# Altium PCB esp32p10displayPCB1.PcbDoc (part 1 of 3)
Units mil, origin at the board's own origin, x right, y up, seen from the top; angles counter-clockwise.
Board outline 3760 x 6044 mil, 2 copper layers (Top Layer, Bottom Layer); 134 components, 104 nets, 470 pads, 215 vias.
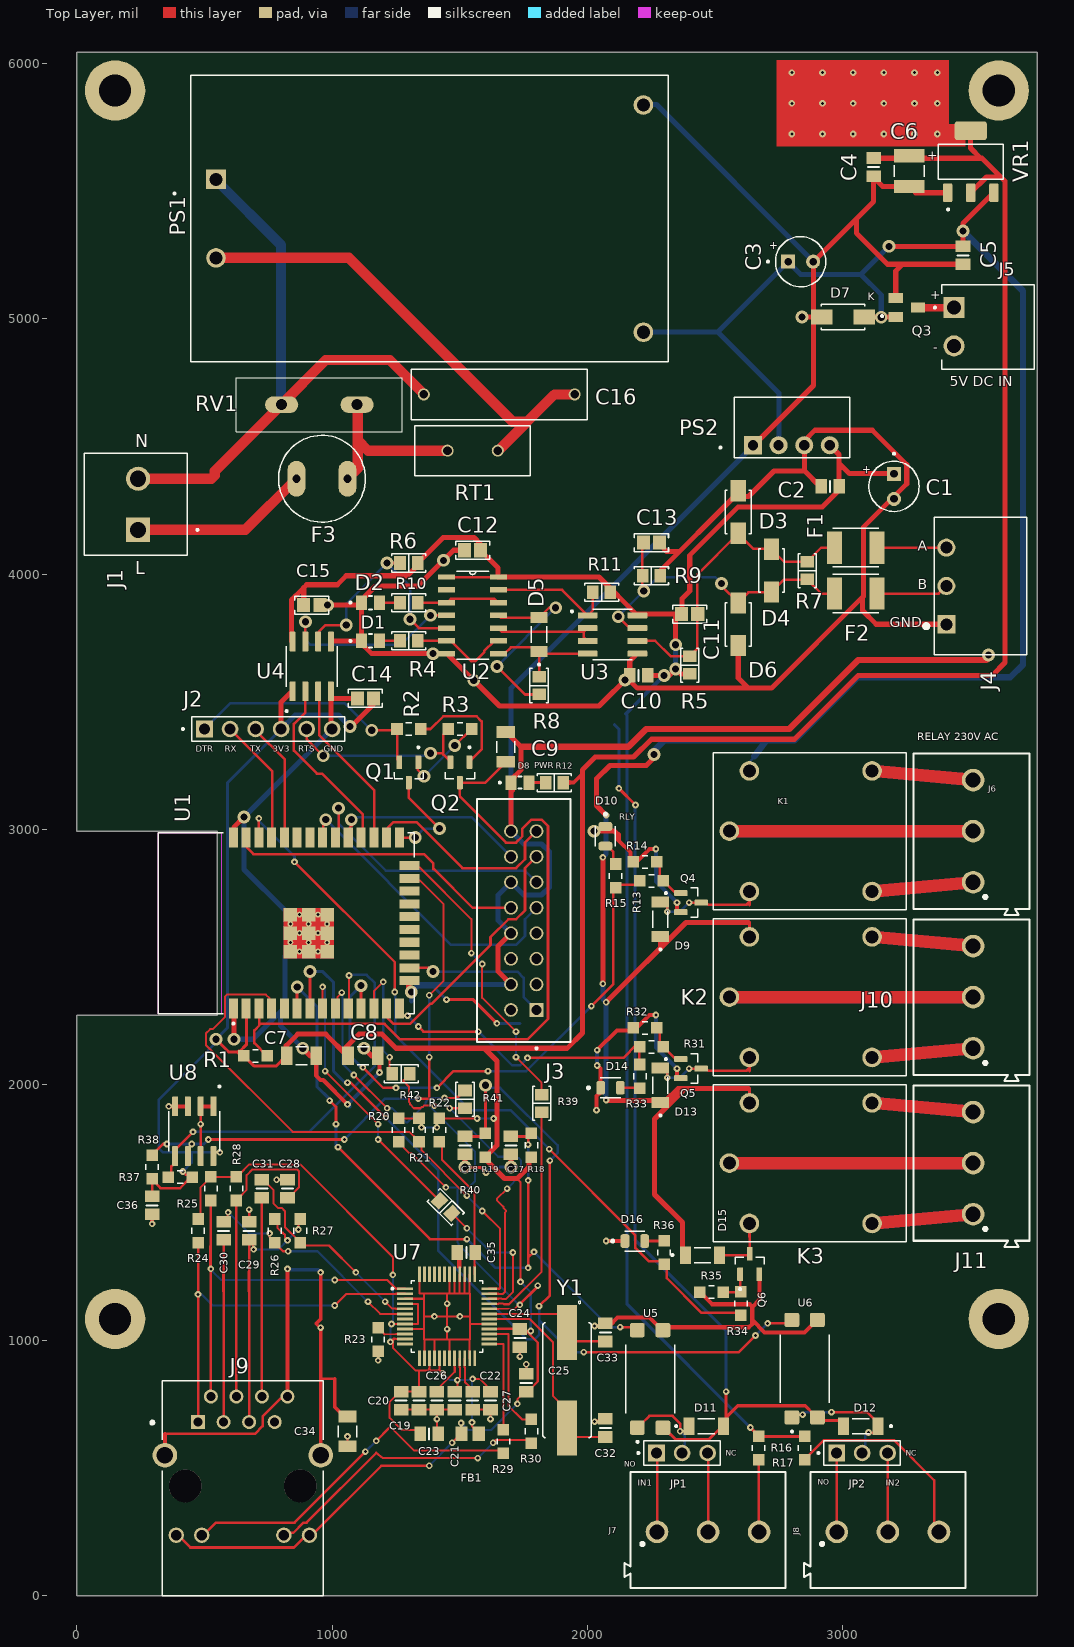
[diagram p0: Top Layer view]
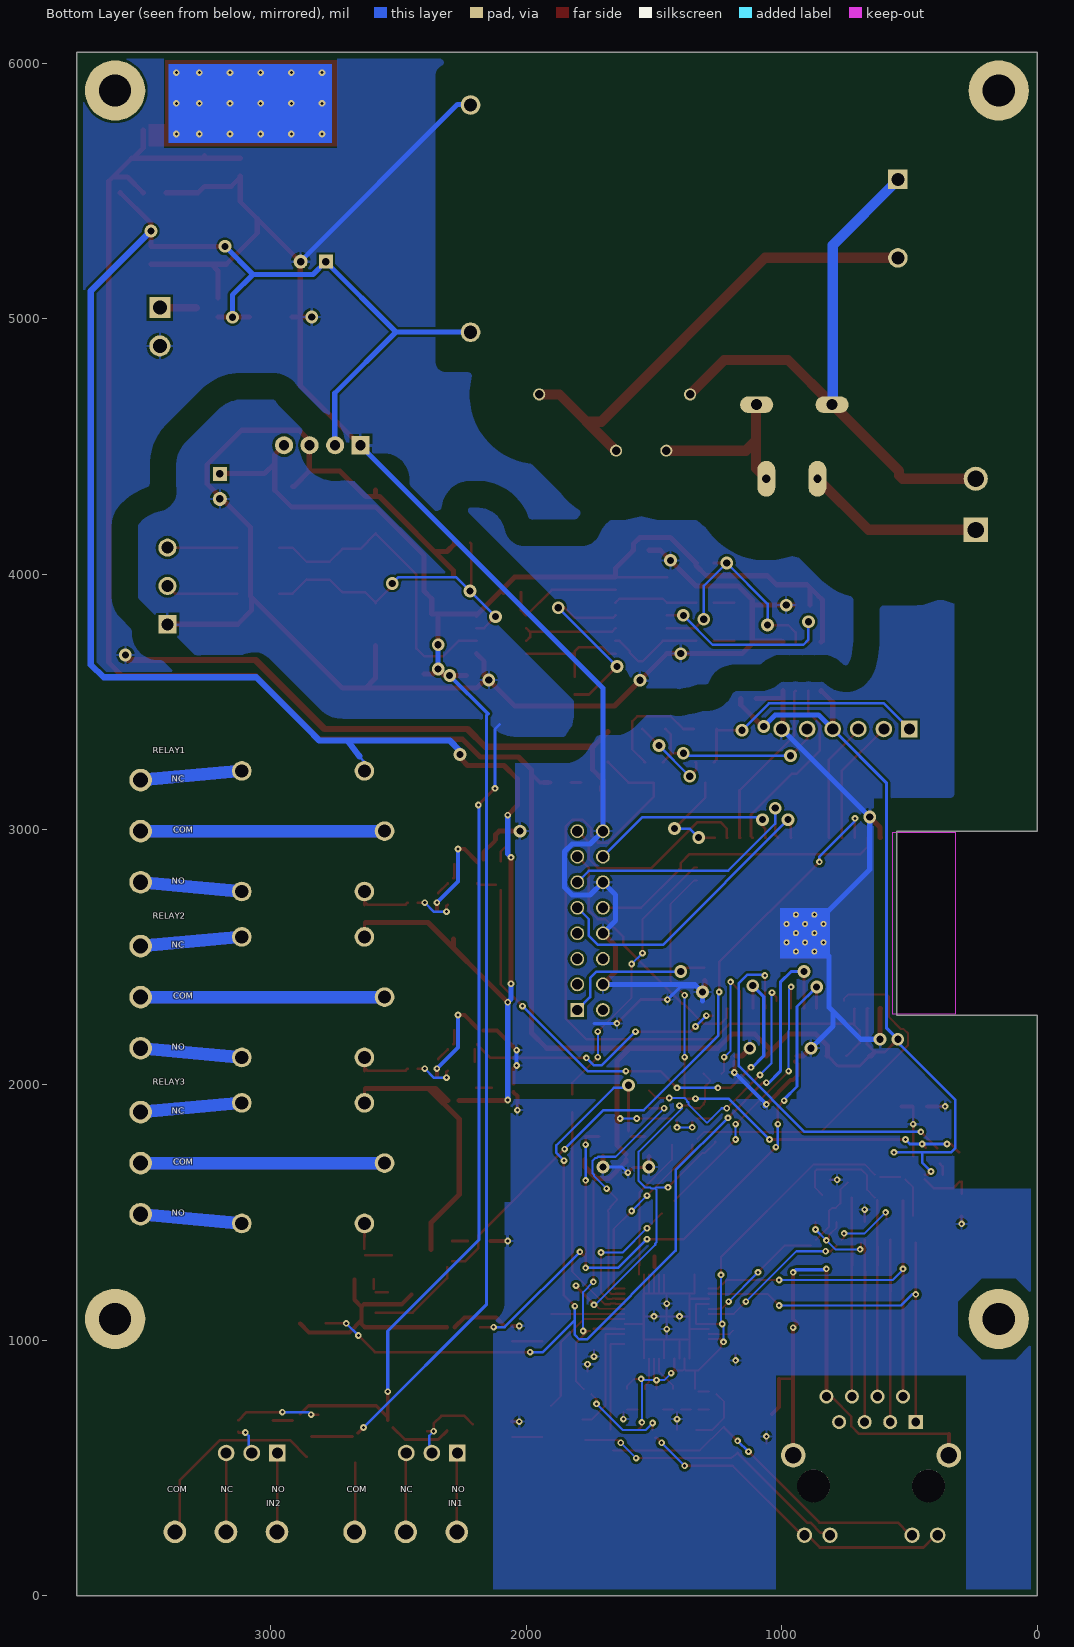
[diagram p1: Bottom Layer view, seen from below]
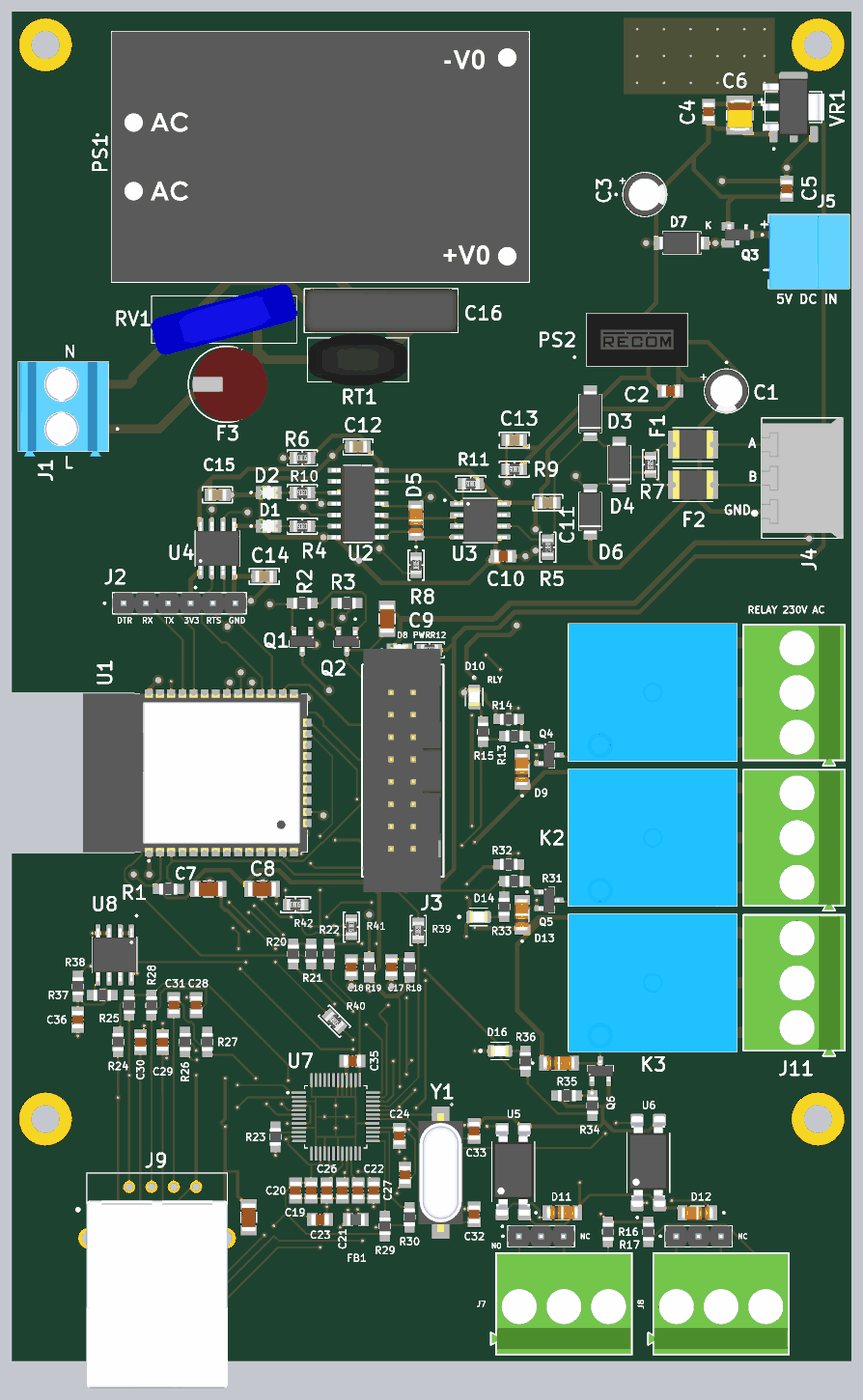
[diagram p3: 3D render of the assembled board from above, using the file's embedded part models]

## Layer stack, top to bottom
Top Solder: solder mask 0.4, Solder Resist, Dk 3.5
Top Layer: signal copper 1.4
Dielectric 1: dielectric 12.6, FR-4, Dk 4.8
Bottom Layer: signal copper 1.4
Bottom Solder: solder mask 0.4, Solder Resist, Dk 3.5

## Board outline
0,0 0,2274 550,2274 550,2994 0,2994 0,6044 3760,6044 3760,0

## Design rules (kind name [scope] priority, off if disabled: settings)
Clearance Clearance_U7 [InComponent('U7') vs InComponent('U7')] p1: gap=8 ignorepadtopadclearanceinfootprint=FALSE
Clearance [All] p2: gap=10 ignorepadtopadclearanceinfootprint=FALSE
HoleSize [All] p1: absolutevalues=TRUE maxlimit=150 minlimit=1 maxpercent=80.000 minpercent=20.000
MinimumSolderMaskSliver [All] p1: minsoldermaskwidth=4
PolygonConnect [All] p1: connectstyle=Relief reliefconductorwidth=10 reliefentries=4 polygonreliefangle="90 Angle" airgapwidth=10
RoutingVias [All] p1: holewidth=28 width=50 viastyle="Through Hole" minholewidth=28 minwidth=50 maxholewidth=28 maxwidth=50
SilkToSolderMaskClearance [IsPad] p1: minsilkscreentomaskgap=4 clearancetoexposedcopper=TRUE
SolderMaskExpansion SolderMaskExpansion_Vias [IsVia] p1: expansion=0 istentingtop=TRUE
SolderMaskExpansion [All] p2: expansion=2.5 istentingtop=FALSE
SupplyNets "Schematic Supply Nets_2" [InNet('3V3A')] p1: voltage=0.000
SupplyNets "Schematic Supply Nets_5" [InNet('ISO_5V')] p2: voltage=0.000
SupplyNets "Schematic Supply Nets_4" [InNet('ISO_GND')] p3: voltage=0.000
SupplyNets "Schematic Supply Nets_3" [InNet('GND')] p4: voltage=0.000
SupplyNets "Schematic Supply Nets_1" [InNet('+5')] p5: voltage=0.000
SupplyNets "Schematic Supply Nets" [InNet('3V3')] p6: voltage=0.000
Width [All] p1: maxlimit=50 minlimit=6 preferedwidth=10 minimp=50.000000 maximp=50.000000 favimp=50.000000
27 further rules are at their usual default settings.

## Classes and differential pairs
component class esp32p10displaySheet4: C36 D13 D14 D15 D16 J10 J11 K2 K3 Q5 Q6 R31 R32 R33 R34 R35 R36 R37 R38 U8
component class esp32p10displaySheet3: C19 C20 C21 C22 C23 C24 C25 C26 C27 C28 C29 C30 C31 C32 C33 C34 C35 FB1 J9 R20 R21 R22 R23 R24 R25 R26 R27 R28 R29 R30 R39 R40 R41 R42 U7 Y1
component class esp32p10displaySheet2: C10 C11 C12 C13 C17 C18 D1 D2 D3 D4 D5 D6 D11 D12 F1 F2 J4 J7 J8 JP1 JP2 R4 R5 R6 R7 R8 R9 R10 R11 R16 R17 R18 R19 U2 U3 U5 U6
component class esp32p10displaySheet1: C1 C2 C3 C4 C5 C6 C7 C8 C9 C14 C15 C16 D7 D8 D9 D10 F3 J1 J2 J3 J5 J6 K1 PS1 PS2 Q1 Q2 Q3 Q4 R1 R2 R3 R12 R13 R14 R15 RT1 RV1 U1 U4 VR1

## Components (designator, comment, footprint, x,y, rotation, side; value= is the part's Value field where it differs from the comment)
C1 "CAP ELE 10µF 25V TH" "CAP ELE 10µF 25V TH" 3200,4344 r270 top
C2 "CAP 0.1uF 100V 0805" "CAP CER 0.1uF/50V 5%" 2950,4344 r0 top
C3 "CAP ELE 100uF 16V TH" "CAP ELE 10µF 25V TH" 2834.21,5224 r0 top
C4 "CAP 0.1uF 100V 0805" "CAP CER 0.1uF/50V 5%" 3120,5594.43 r90 top
C5 "CAP 0.1uF 100V 0805" "CAP CER 0.1uF/50V 5%" 3470,5249 r90 top
C6 "TANT CAP 10uF/16V 10% 3528(B)" "TANT CAP 3528(B)" 3260,5579 r270 top
C7 "10uF" CAPC3216X175N 880,2114 r0 top
C8 "100nF" CAPC3216X175N 1120,2114 r0 top
C9 "1uF" CAPC3216X175N 1680,3324 r90 top
C10 "0.1uf" CAPC2012X140N 2200,3604 r180 top
C11 "1nF" "CAP 0805_2012" 2400,3844 r180 top value="1000 pF"
C12 "100nF" "CAP 0805_2012" 1550,4094 r0 top value="100 nF"
C13 "1nF" "CAP 0805_2012" 2250,4124 r180 top value="1000 pF"
C14 "100nF" "CAP 0805_2012" 1130,3514 r0 top value="100 nF"
C15 "100nF" "CAP 0805_2012" 920,3879 r180 top value="100 nF"
C16 "0.1uF X2 275VAC" CAPRR1500W60L1750T500H1200 1654,4704 r180 top
C17 "100nF" CAPC2012X140N 1700,1764 r270 top
C18 "100nF" CAPC2012X140N 1520,1764 r270 top
C19 "100nF" CAPC2012X140N 1270,764 r270 top
C20 "100nF" CAPC2012X140N 1340,764 r270 top
C21 "100nF" CAPC2012X140N 1480,764 r270 top
C22 "100nF" CAPC2012X140N 1620,764 r270 top
C23 "10uF" CAPC2012X140N 1380,634 r0 top
C24 "100nF" CAPC2012X140N 1735,1009 r270 top
C25 "10uF" CAPC2012X140N 1760,834 r90 top
C26 "4.7uF" CAPC2012X140N 1410,764 r270 top
C27 "10nF" CAPC2012X140N 1550,764 r270 top
C28 "22nF" CAPC2012X140N 825,1594 r90 top
C29 "10nF" CAPC2012X140N 675,1429 r90 top
C30 "6.8nF" CAPC2012X140N 575,1429 r90 top
C31 "6.8nF" CAPC2012X140N 725,1594 r90 top
C32 "27pF" CAPC2012X140N 2070,657 r90 top
C33 "27pF" CAPC2012X140N 2070,1031 r90 top
C34 "1nF 2kV" CAPC3216X175N 1060,644 r90 top
C35 "100nF" CAPC2012X140N 1525,1344 r180 top
C36 "100nF" CAPC2012X140N 295,1529 r270 top
D1 "597-3305-607F" LEDC2012X70N 1150,3739 r0 top
D2 "597-3305-607F" LEDC2012X70N 1150,3889 r0 top
D3 "SMAJ7.5CA" DIOM4325X250N#1 2590,4244 r90 top
D4 "SMAJ7.5CA" DIOM4325X250N#1 2720,4014 r90 top
D5 "LL4148_L1G" DIOMELF3515N 1810,3764 r90 top
D6 "SMAJ7.5CA" DIOM4325X250N#1 2590,3804 r90 top
D7 "SMAJ5.0A" DIOM4325X250N#2 3000,5007 r180 top
D8 "597-3305-607F" LEDC2012X70N 1735,3184 r0 top
D9 "LL4148_L1G" DIOMELF3515N 2285,2649 r90 top
D10 "APT2012SRCPRV" LEDC2012X75N 2070,2974 r270 top
D11 "LL4148_L1G" DIOMELF3515N 2465,664 r0 top
D12 "LL4148_L1G" DIOMELF3515N 3070,664 r180 top
D13 "LL4148_L1G" DIOMELF3515N 2285,1999 r90 top
D14 "APT2012SRCPRV" LEDC2012X75N 2090,1989 r0 top
D15 "LL4148_L1G" DIOMELF3515N 2450,1334 r0 top
D16 "APT2012SRCPRV" LEDC2012X75N 2185,1389 r0 top
F1 "MF-MSMF010-2" FUSER_MF-MSMF010-2 3050,4104 r0 top
F2 "MF-MSMF010-2" FUSER_MF-MSMF010-2 3050,3924 r0 top
F3 "T1A 250V" TR5 960,4374 r0 top
FB1 "FB 1k@100MHz" BEADC2012X105N 1540,634 r0 top
J1 "TB007-508-02BE" CUI_TB007-508-02BE 240,4174 r90 top
J2 "68604-406HLF" AMPHENOL_68604-406HLF 750,3394 r0 top
J3 "TSS-108-01-T-D" SAMTEC_TSS-108-01-T-D 1800,2294 r90 top
J4 "284513-3" TE_284513-3 3405,3954 r90 top
J5 "TBP02R1-381-02BE" CUI_TBP02R138102BE 3435,4969 r270 top
J6 "RELAY OUT" 691236510003 3510,2994 r90 top
J7 "INPUT 1" 691236510003 2472,250 r0 top
J8 "INPUT 2" 691236510003 3176,250 r0 top
J9 "HR911105A" HANRUN_HR911105A 650,430 r180 top
J10 "RELAY OUT" 691236510003 3510,2344 r90 top
J11 "RELAY OUT" 691236510003 3510,1694 r90 top
JP1 "NO/NC SEL" AMPHENOL_68001-403HLF 2370,559 r0 top
JP2 "NO/NC SEL" AMPHENOL_68001-403HLF 3075,559 r0 top
K1 "SRD-05VDC-SL-C" RELAY_SRD-03VDC-SL-C 2870,2994 r0 top
K2 "SRD-05VDC-SL-C" RELAY_SRD-03VDC-SL-C 2870,2344 r0 top
K3 "SRD-05VDC-SL-C" RELAY_SRD-03VDC-SL-C 2870,1694 r0 top
PS1 "HLK-10M05" CONV_HLK-10M05 1381.61,5392.54 r0 top
PS2 "RFM-0505S SIP4" RFM-0505S 2800,4574 r0 top
Q1 "BC848C_RFG" SOT95P237X112-3N 1300,3224 r270 top
Q2 "BC848C_RFG" SOT95P237X112-3N 1500,3224 r270 top
Q3 "SI2301" DESTO_SOT23 3250,5044 r270 top
Q4 "BC848C_RFG" SOT95P237X112-3N 2405,2714 r0 top
Q5 "BC848C_RFG" SOT95P237X112-3N 2405,2064 r0 top
Q6 "BC848C_RFG" SOT95P237X112-3N 2635,1299 r90 top
R1 "10k" RES_ERA6VRB1002V 700,2114 r0 top
R2 "10k" RES_ERA6VRB1002V 1300,3394 r0 top
R3 "10k" RES_ERA6VRB1002V 1500,3394 r0 top
R4 "330 Ohms" "RES 0805_2012" 1300,3739 r180 top
R5 "330 Ohms" "RES 0805_2012" 2400,3644 r270 top value="470 Ohms"
R6 "10 kOhms" "RES 0805_2012" 1300,4044 r0 top
R7 "120 Ohms" "RES 0805_2012" 2860,4014 r90 top value="10 kOhms"
R8 "1 kOhms" "RES 0805_2012" 1810,3564 r90 top
R9 "330 Ohms" "RES 0805_2012" 2250,3994 r180 top value="470 Ohms"
R10 "330 Ohms" "RES 0805_2012" 1300,3889 r180 top
R11 "10 kOhms" "RES 0805_2012" 2055,3929 r180 top
R12 "150 Ohms" "RES 0805_2012" 1870,3184 r180 top
R13 "1k" RES_ERA6VRB1002V 2250,2799 r0 top
R14 "10k" RES_ERA6VRB1002V 2225,2874 r0 top
R15 "1k" RES_ERA6VRB1002V 2110,2819 r270 top
R16 "1k" RES_ERA6VRB1002V 2670,579 r90 top
R17 "1k" RES_ERA6VRB1002V 2850,579 r90 top
R18 "10k" RES_ERA6VRB1002V 1780,1764 r270 top
R19 "10k" RES_ERA6VRB1002V 1600,1764 r270 top
R20 "10k" RES_ERA6VRB1002V 1260,1824 r90 top
R21 "10k" RES_ERA6VRB1002V 1340,1824 r90 top
R22 "10k" RES_ERA6VRB1002V 1420,1824 r90 top
R23 "12.4k 1%" RES_ERA6VRB1002V 1180,1004 r90 top
R24 "49.9R 1%" RES_ERA6VRB1002V 475,1429 r90 top
R25 "49.9R 1%" RES_ERA6VRB1002V 525,1594 r90 top
R26 "49.9R 1%" RES_ERA6VRB1002V 775,1429 r90 top
R27 "49.9R 1%" RES_ERA6VRB1002V 875,1429 r90 top
R28 "10R" RES_ERA6VRB1002V 625,1594 r90 top
R29 "330R" RES_ERA6VRB1002V 1670,604 r270 top
R30 "330R" RES_ERA6VRB1002V 1780,644 r270 top
R31 "1k" RES_ERA6VRB1002V 2250,2149 r0 top
R32 "10k" RES_ERA6VRB1002V 2225,2224 r0 top
R33 "1k" RES_ERA6VRB1002V 2205,2034 r90 top
R34 "1k" RES_ERA6VRB1002V 2600,1144 r90 top
R35 "10k" RES_ERA6VRB1002V 2485,1189 r0 top
R36 "1k" RES_ERA6VRB1002V 2300,1344 r270 top
R37 "4.7k" RES_ERA6VRB1002V 405,1639 r0 top
R38 "4.7k" RES_ERA6VRB1002V 295,1679 r270 top
R39 "47 Ohms" "RES 0805_2012" 1820,1928.1 r270 top
R40 "47 Ohms" "RES 0805_2012" 1444.53,1521.97 r315 top
R41 "47 Ohms" "RES 0805_2012" 1520,1944 r270 top
R42 "47 Ohms" "RES 0805_2012" 1270,2044 r0 top
RT1 "5R NTC" THRMRB500W60L1150T500H1600 1550,4484 r0 top
RV1 "14D471K" MOV14D471K 950,4664 r180 top
U1 "ESP32-WROOM-32" MODULE_ESP32-WROOM-32 820,2634 r90 top
U2 "74HC14D" SOIC127P600X175-14N 1550,3839 r0 top
U3 "SN65176BDR" SOIC127P599X175-8N 2097.76,3764 r0 top
U4 "ADUM1201CR" SOIC127P600X175-8N 920,3639 r90 top
U5 "EL817S1" SOIC254P1030X390-4N_EL817S1(A)(TU)-V 2245,849 r90 top
U6 "EL817S1" SOIC254P1030X390-4N_EL817S1(A)(TU)-V 2850,889 r90 top
U7 "W5500" QFP50P900X900X160-48N 1450,1094 r0 top
U8 "AT24C512C-SSHM-T" SOIC127P600X175-8N 460,1819 r270 top
VR1 "LM1117IMPX-3.3V SOT-223" "LM1117IMPX-3.3V SOT-223" 3500.55,5615.46 r90 top
Y1 "25MHz 18pF" XTAL1170X500X450 1920,844 r270 top

## Footprints (in the part's own frame and the unit in brackets; to place one, negate y for a bottom-side part, rotate by r counter-clockwise, add the part's x,y. Pads: shape width x height; smd on the part's side, far side on the other; paste and mask are expansions set on the pad)
691236510003 [mm]
  round 2.25 hole 1.5: 1(-5.08,0) 2(0,0) 3(5.08,0)
  silkscreen extent -8.32,-5.6 7.72,5.95, body extent -8.22,-5.5 7.62,5.85, height 18
AMPHENOL_68001-403HLF [mm]
  rect 1.65x1.65 / inner round 1.65 / far side rect 1.65x1.65 hole 1.1: 1(-2.54,0)
  round 1.65 hole 1.1: 2(0,0) 3(2.54,0)
  silkscreen extent -4.45,-1.2 3.81,1.2, body extent -3.81,-1.2 3.81,1.2, height 8.38
AMPHENOL_68604-406HLF [mm]
  rect 1.65x1.65 / inner round 1.65 / far side rect 1.65x1.65 hole 1.1: 1(-6.35,0)
  round 1.65 hole 1.1: 2(-3.81,0) 3(-1.27,0) 4(1.27,0) 5(3.81,0) 6(6.35,0)
  silkscreen extent -8.6,-1.2 7.62,1.2, body extent -7.62,-1.2 7.62,1.2, height 12.19
BEADC2012X105N [mm]
  rect 1.2x1.47 smd: 1(-0.86,0) 2(0.86,0)
  body extent -1,-0.64 1,0.64, height 1.26
"CAP 0805_2012" [mm]
  rect 1.3x1.4 smd: 1(-0.8,0) 2(0.8,0)
  silkscreen extent -1.7,-0.9 1.7,0.9, body extent -1,-0.64 1,0.64, height 1.26
"CAP CER 0.1uF/50V 5%" [mm] "CAP CER 0.1uF/50V  Ceramic Capacitor X7R 0805 (2012 Metric) SMT"
  rect 1.15x1.45 smd: 1(-0.9,0) 2(0.9,0)
  silkscreen extent 0,-0.55 0,0.55, body extent -1,-0.63 1,0.63, height 1.35
"CAP ELE 10µF 25V TH" [mm] "10µF 25V Aluminum Electrolytic Capacitors Radial Lead Type THT, Dia-5mm, Pitch-2mm ECEA1EN100UI"
  round 1.4 hole 0.75: N(1.25,0)
  rect 1.4x1.4 hole 0.75: P(-1.25,0)
  silkscreen extent -3.35,-2.5 2.5,2.5, body extent -2.5,-2.5 2.5,2.5, height 11
CAPC2012X140N [mm]
  rect 1.15x1.45 smd: 1(-0.9,0) 2(0.9,0)
  silkscreen extent 0,-0.55 0,0.55, body extent -1,-0.63 1,0.63, height 1.35
CAPC3216X175N [mm]
  rect 1.16x1.82 smd: 1(-1.475,0) 2(1.475,0)
  silkscreen extent -0.57,-0.9 0.57,0.9, body extent -1.6,-0.8 1.6,0.8, height 1.75
CAPRR1500W60L1750T500H1200 [mm]
  round 1.2 hole 0.85: 1(-7.5,0) 2(7.5,0)
  silkscreen extent -8.75,-2.5 8.75,2.5, body extent -8.75,-2.5 8.75,2.5, height 12
CONV_HLK-10M05 [mm]
  rect 1.95x1.95 / inner round 1.95 / far side rect 1.95x1.95 hole 1.3: 1(-21.25,3.9)
  round 1.95 hole 1.3: 2(-21.25,-3.9) 3(21.25,11.3) 4(21.25,-11.3)
  silkscreen extent -25.47,-14.25 23.75,14.25, body extent -23.75,-14.25 23.75,14.25, height 22
CUI_TB007-508-02BE [mm]
  rect 2.4x2.4 / inner round 2.4 / far side rect 2.4x2.4 hole 1.6: 1(0,0)
  round 2.4 hole 1.6: 2(5.08,0)
  silkscreen extent -2.54,-6 7.62,5.35, body extent -3.14,-4.9 7.62,5.35, height 14
CUI_TBP02R138102BE [mm]
  rect 2.1x2.1 / inner round 2.1 / far side rect 2.1x2.1 hole 1.4: 1(-1.905,0)
  round 2.1 hole 1.4: 2(1.905,0)
  silkscreen extent -4.21,-2 4.21,8, body extent -4.19,-1.17 4.22,8.03, height 7.2
DESTO_SOT23 [mm]
  rect 1x1.4 smd: 1(-0.95,-1.1) 2(0.95,-1.1) 3(0,1.1)
  body extent -1.18,-1.46 1.18,1.46, height 1.25
DIOM4325X250N#1 [mm]
  rect 2.12x1.5 smd: 1(-2.115,0) 2(2.115,0)
  silkscreen extent -2.16,-1.28 2.16,1.28, body extent -2.57,-1.28 2.57,1.28, height 2.5
DIOM4325X250N#2 [mm]
  rect 2.12x1.5 smd: A(2.115,0) C(-2.115,0)
  silkscreen extent -4,-1.28 2.16,1.28, body extent -2.57,-1.28 2.57,1.28, height 2.5
DIOMELF3515N [mm]
  rect 1.11x1.73 smd: A(1.705,0) C(-1.705,0)
  silkscreen extent -3.1,-0.75 0.83,0.75, body extent -1.75,-0.76 1.75,0.83, height 1.57
FUSER_MF-MSMF010-2 [mm]
  rect 1.5x3.2 smd: 1(-2.1,0) 2(2.1,0)
  silkscreen extent -2.27,-1.91 2.27,1.91, body extent -2.27,-1.62 2.27,1.62, height 0.85
HANRUN_HR911105A [mm]
  rect 1.398x1.398 / inner round 1.398 / far side rect 1.398x1.398 hole 0.89: 1(4.45,-6.35)
  round 1.398 hole 0.89: 2(3.18,-8.89) 3(1.91,-6.35) 4(0.64,-8.89) 5(-0.63,-6.35) 6(-1.9,-8.89) 7(-3.17,-6.35) 8(-4.44,-8.89)
  round 1.53 hole 1.02: 9(6.625,4.9) 10(4.085,4.9) 11(-4.085,4.9) 12(-6.625,4.9)
  round 2.445 hole 1.63: 15(7.745,-3.05) 16(-7.745,-3.05)
  round 3.25 hole 3.25 unplated: ""(-5.715,0) ""(5.715,0)
  silkscreen extent -8,-10.48 9.15,10.92, body extent -8.02,-7.35 8.02,13.95, height 13.5
LEDC2012X70N [mm]
  rect 1.1x1.45 smd: A(0.9,0) C(-0.9,0)
  silkscreen extent -2.1,-0.68 0.14,0.68, body extent -1,-0.63 1,0.63, height 0.7
LEDC2012X75N [mm]
  rrect50% 0.86x1.36 smd: A(0.975,0) C(-0.975,0)
  silkscreen extent -2.3,-0.99 1,0.99, body extent -1,-0.63 1,0.63, height 0.75
"LM1117IMPX-3.3V SOT-223" [mm] "LM1117IMPX-3.3V 800-mA 15-V linear voltage regulator SOT230P700X180-4N"
  rrect25% 1.84x0.93 smd: 1(-3.085,2.3) 2(-3.085,0) 3(-3.085,-2.3)
  rrect25% 1.84x3.19 smd: 4(3.085,0)
  silkscreen extent -4.85,-3.25 1.75,3.25, body extent -3.5,-3.25 3.5,3.25, height 1.8
MODULE_ESP32-WROOM-32 [mm]
  rect 2x0.9 smd: 1(-8.5,5.26) 2(-8.5,3.99) 3(-8.5,2.72) 4(-8.5,1.45) 5(-8.5,0.18) 6(-8.5,-1.09) 7(-8.5,-2.36) 8(-8.5,-3.63) 9(-8.5,-4.9) 10(-8.5,-6.17) 11(-8.5,-7.44) 12(-8.5,-8.71) 13(-8.5,-9.98) 14(-8.5,-11.25) 25(8.5,-11.25) 26(8.5,-9.98) 27(8.5,-8.71) 28(8.5,-7.44) 29(8.5,-6.17) 30(8.5,-4.9) 31(8.5,-3.63) 32(8.5,-2.36) 33(8.5,-1.09) 34(8.5,0.18) 35(8.5,1.45) 36(8.5,2.72) 37(8.5,3.99) 38(8.5,5.26)
  rect 0.9x2 smd: 15(-5.715,-12.25) 16(-4.445,-12.25) 17(-3.175,-12.25) 18(-1.905,-12.25) 19(-0.635,-12.25) 20(0.635,-12.25) 21(1.905,-12.25) 22(3.175,-12.25) 23(4.445,-12.25) 24(5.715,-12.25)
  rect 1.33x1.33 smd: 39_1(-2.835,-0.405) 39_2(-1,-0.405) 39_3(0.835,-0.405) 39_4(-2.835,-2.24) 39_5(-1,-2.24) 39_6(0.835,-2.24) 39_7(-2.835,-4.075) 39_8(-1,-4.075) 39_9(0.835,-4.075)
  round 0.6 hole 0.3: 39_10(-1.917,-0.405) 39_11(-0.082,-0.405) 39_12(-2.835,-1.322) 39_13(-1,-1.322) 39_14(0.835,-1.322) 39_15(-1.917,-2.24) 39_16(-0.082,-2.24) 39_17(-2.835,-3.157) 39_18(-1,-3.157) 39_19(0.835,-3.157) 39_20(-1.917,-4.075) 39_21(-0.082,-4.075)
  Keep-Out Layer region: 9,6.45 -9,6.45 -9,12.75 9,12.75
  Keep-Out Layer region: 9,6.45 -9,6.45 -9,12.75 9,12.75
  silkscreen extent -10.1,-12.75 9,12.75, body extent -9,-12.75 9,12.75, height 3.2
MOV14D471K [mm]
  oval 3.3x1.65 hole 1.1: 1(-3.75,0) 2(3.75,0)
  silkscreen extent -8.25,-2.7 8.25,2.7, body extent -8.28,-4 8.28,4, height 11.75
QFP50P900X900X160-48N [mm]
  rect 1.56x0.28 smd: 1(-4.18,2.75) 2(-4.18,2.25) 3(-4.18,1.75) 4(-4.18,1.25) 5(-4.18,0.75) 6(-4.18,0.25) 7(-4.18,-0.25) 8(-4.18,-0.75) 9(-4.18,-1.25) 10(-4.18,-1.75) 11(-4.18,-2.25) 12(-4.18,-2.75) 25(4.18,-2.75) 26(4.18,-2.25) 27(4.18,-1.75) 28(4.18,-1.25) 29(4.18,-0.75) 30(4.18,-0.25) 31(4.18,0.25) 32(4.18,0.75) 33(4.18,1.25) 34(4.18,1.75) 35(4.18,2.25) 36(4.18,2.75)
  rect 0.28x1.56 smd: 13(-2.75,-4.18) 14(-2.25,-4.18) 15(-1.75,-4.18) 16(-1.25,-4.18) 17(-0.75,-4.18) 18(-0.25,-4.18) 19(0.25,-4.18) 20(0.75,-4.18) 21(1.25,-4.18) 22(1.75,-4.18) 23(2.25,-4.18) 24(2.75,-4.18) 37(2.75,4.18) 38(2.25,4.18) 39(1.75,4.18) 40(1.25,4.18) 41(0.75,4.18) 42(0.25,4.18) 43(-0.25,4.18) 44(-0.75,4.18) 45(-1.25,4.18) 46(-1.75,4.18) 47(-2.25,4.18) 48(-2.75,4.18)
  silkscreen extent -5.55,-3.55 3.55,3.55
RELAY_SRD-03VDC-SL-C [mm]
  round 1.95 hole 1.3: COIL1(-6,6) COIL2(-6,-6) COM(-8,0) NC(6.2,6) NO(6.2,-6)
  silkscreen extent -9.6,-7.8 9.6,7.8, body extent -9.6,-7.8 9.6,7.8, height 15.8
"RES 0805_2012" [mm]
  rect 1.15x1.35 smd: 1(-0.875,0) 2(0.875,0)
  silkscreen extent -1.7,-0.9 1.7,0.9, body extent -1,-0.62 1,0.63, height 0.6
RES_ERA6VRB1002V [mm]
  rect 1.15x1.15 smd: 1(-1.175,0) 2(1.175,0)
  silkscreen extent -0.28,-0.63 0.28,0.63, body extent -1,-0.63 1,0.63, height 0.7
RFM-0505S [mm] "DC-DC Converter/Isolator, SIP4, THT S/T 1kV unreg, Single Output, 1W, 5V Out, RFM Series RFM-0505S"
  rect 1.8x1.8 hole 1: 1(-3.85,-1.75)
  round 1.8 hole 1: 2(-1.31,-1.75) 3(1.23,-1.75) 4(3.77,-1.75)
  silkscreen extent -7.21,-3 5.75,3, body extent -5.75,-3 5.75,3, height 10
SAMTEC_TSS-108-01-T-D [mm]
  rect 1.37x1.37 hole 1.02: 01(0,0)
  round 1.37 hole 1.02: 02(0,2.54) 03(2.54,0) 04(2.54,2.54) 05(5.08,0) 06(5.08,2.54) 07(7.62,0) 08(7.62,2.54) 09(10.16,0) 10(10.16,2.54) 11(12.7,0) 12(12.7,2.54) 13(15.24,0) 14(15.24,2.54) 15(17.78,0) 16(17.78,2.54)
  silkscreen extent -3.92,-3.36 20.95,5.9, body extent -4.95,-3.05 22.73,5.72, height 9.53
SOIC127P599X175-8N [mm]
  rrect25% 1.97x0.6 smd paste+0 mask+0.102: 1(-2.47,1.905) 2(-2.47,0.635) 3(-2.47,-0.635) 4(-2.47,-1.905) 5(2.47,-1.905) 6(2.47,-0.635) 7(2.47,0.635) 8(2.47,1.905)
  silkscreen extent -4.14,-2.52 1.95,2.52, body extent -3,-2.45 3,2.45, height 1.75
SOIC127P600X175-8N [mm]
  rrect25% 1.97x0.59 smd paste+0 mask+0.102: 1(-2.475,1.905) 2(-2.475,0.635) 3(-2.475,-0.635) 4(-2.475,-1.905) 5(2.475,-1.905) 6(2.475,-0.635) 7(2.475,0.635) 8(2.475,1.905)
  silkscreen extent -4.54,-2.52 2,2.59, body extent -3,-2.49 3,2.49, height 1.68
SOIC127P600X175-14N [mil]
  rect 67x21 smd: 1(-102,150) 2(-102,100) 3(-102,50) 4(-102,0) 5(-102,-50) 6(-102,-100) 7(-102,-150) 8(102,-150) 9(102,-100) 10(102,-50) 11(102,0) 12(102,50) 13(102,100) 14(102,150)
  silkscreen extent -63,-172 63,172, body extent -118,-170 118,170, height 69
SOIC254P1030X390-4N_EL817S1(A)(TU)-V [mm]
  rrect25% 1.41x1.47 smd: 1(-4.85,1.27) 2(-4.85,-1.27) 3(4.85,-1.27) 4(4.85,1.27)
  silkscreen extent -6.35,-2.44 3.4,2.44, body extent -5.02,-2.29 5.28,2.29, height 3.9
SOT95P237X112-3N [mm]
  rrect25% 1.32x0.59 smd: 1(-1.015,0.95) 2(-1.015,-0.95) 3(1.015,0)
  silkscreen extent -2.6,-1.46 0.65,1.46, body extent -1.19,-1.46 1.19,1.46, height 1.12
"TANT CAP 3528(B)" [mm] "10 ÂµF Molded Tantalum Polymer Capacitor 25 V 1411 (3528 Metric), 1210 150mOhm TCJB106M025R0150"
  rect 1.34x3.02 smd: 1(-1.54,0) 2(1.54,0)
  silkscreen extent -0.55,-1.5 0.55,1.5, body extent -1.75,-1.4 1.75,1.4, height 2.1
TE_284513-3 [mm]
  rect 1.8x1.8 / inner round 1.8 / far side rect 1.8x1.8 hole 1.2: 1(-3.81,0)
  round 1.8 hole 1.2: 2(0,0) 3(3.81,0)
  silkscreen extent -6.86,-8 6.86,2.2, body extent -6.86,-8 6.86,1.2, height 7.3
THRMRB500W60L1150T500H1600 [mm]
  round 1.2 hole 0.85: 1(-2.5,0) 2(2.5,0)
  silkscreen extent -5.75,-2.5 5.75,2.5, body extent -3.24,-2.14 3.2,2.1, height 15.34
TR5 [mil]
  oval 70x140 hole 32 mask+4.02: 1(-100,0) 2(100,0)
  silkscreen extent -170,-170 170,170, body extent -150,-33 100,33, height 296
XTAL1170X500X450 [mm]
  rect 5.5x2 smd: 1(-4.75,0) 2(4.75,0)
  silkscreen extent -7.88,-2.41 5.72,2.41, body extent -6.75,-2.5 6.75,2.5, height 4.5

## Part data
C1: "10µF 25V Aluminum Electrolytic Capacitors Radial Lead Type TH, Dia-5mm, Pitch-2mm ECEA1EN100UI", Package="RADIAL-2 Panasonic", Check_prices=https://www.snapeda.com/parts/ECEA1EN100UI/Panasonic/view-part/5788532/?ref=eda, Digi-Key_Part_Number=ECE-A1EN100UI-ND, MF=Panasonic, MP=ECEA1EN100UI, Purchase-URL=https://pricing.snapeda.com/search/part/ECEA1EN100UI/?ref=eda, SnapEDA_Link=https://www.snapeda.com/parts/ECEA1EN100UI/Panasonic/view-part/5788532/?ref=snap
C2: library part "CAP CER 0.1uF/50V 5%", "CAP CER 0.1uF/100V  Ceramic Capacitor X7R 0805 (2012 Metric)", Package="0805 Samsung", Check_prices=https://www.snapeda.com/parts/CL21B104KCFNNNE/Samsung+Electro-Mechanics/view-part/?ref=eda, Digi-Key_Part_Number=1276-6840-2-ND, MF=Samsung, MP=CL21B104KCFNNNE, Purchase-URL=https://pricing.snapeda.com/search?q=CL21B104KCFNNNE&ref=eda, SnapEDA_Link=https://www.snapeda.com/parts/CL21B104KCFNNNE/Samsung+Electro-Mechanics/view-part/?ref=snap
C3: library part "CAP ELE 10µF 25V TH", "100uF 16V Aluminum Electrolytic Capacitor Radial TH, Dia-5mm x 11mm (Panasonic M series)", Package="RADIAL-2 Panasonic", MF=Panasonic, MP=ECA-1CM101
C4 C5: library part "CAP CER 0.1uF/50V 5%", "CAP CER 0.1uF/100V  Ceramic Capacitor X7R 0805 (2012 Metric) SMT", Package="0805 Samsung", Check_prices=https://www.snapeda.com/parts/CL21B104KCFNNNE/Samsung+Electro-Mechanics/view-part/?ref=eda, Digi-Key_Part_Number=1276-6840-2-ND, MF=Samsung, MP=CL21B104KCFNNNE, Purchase-URL=https://pricing.snapeda.com/search?q=CL21B104KCFNNNE&ref=eda, SnapEDA_Link=https://www.snapeda.com/parts/CL21B104KCFNNNE/Samsung+Electro-Mechanics/view-part/?ref=snap
C6: library part "TANT CAP 10uF/16V 5% 3528(B)", "10 µF Molded Tantalum Capacitor 16V 10% 1411 (3528 Metric), 1210 TAJB106K016RNJ", Package="1210 AVX", Check_prices=https://www.snapeda.com/parts/TAJB106K016RNJ/AVX/view-part/?ref=eda, MF=AVX, MP=TAJB106K016RNJ, SnapEDA_Link=https://www.snapeda.com/parts/TAJB106K016RNJ/AVX/view-part/?ref=snap
C7: library part C1206C102KGRACAUTO, "10 µF ±10% 16V Ceramic Capacitor X7R 1206 (3216 Metric)", Package="3216 KEMET", Check_prices=https://www.snapeda.com/search?q=GRM31CR71C106KAC7L&ref=eda, MF=Murata, MP=GRM31CR71C106KAC7L, SnapEDA_Link=https://www.snapeda.com/search?q=GRM31CR71C106KAC7L&ref=snap
C8: library part C1206C102KGRACAUTO, "0.1 µF ±10% 50V Ceramic Capacitor X7R 1206 (3216 Metric)", Package="3216 KEMET", Check_prices=https://www.snapeda.com/search?q=C1206C104K5RACTU&ref=eda, MF=KEMET, MP=C1206C104K5RACTU, SnapEDA_Link=https://www.snapeda.com/search?q=C1206C104K5RACTU&ref=snap
C9: library part C1206C102KGRACAUTO, "1 µF ±10% 50V Ceramic Capacitor X7R 1206 (3216 Metric)", Package="3216 KEMET", Check_prices=https://www.snapeda.com/search?q=C1206C105K5RACTU&ref=eda, MF=KEMET, MP=C1206C105K5RACTU, SnapEDA_Link=https://www.snapeda.com/search?q=C1206C105K5RACTU&ref=snap
C10 C17 C18 C19 C20 C21 C22 C23 C24 C25 C26 C27 C28 C29 C30 C31 C32 C33 C35 C36: library part CL21B104KCFNNNE, "0.1 ÂµF Â±10% 100V Ceramic Capacitor X7R 0805 (2012 Metric)", Package="0805 Samsung", Check_prices=https://www.snapeda.com/parts/CL21B104KCFNNNE/Samsung+Electro-Mechanics/view-part/?ref=eda, Digi-Key_Part_Number=1276-6840-2-ND, MF=Samsung, Purchase-URL=https://pricing.snapeda.com/search?q=CL21B104KCFNNNE&ref=eda, SnapEDA_Link=https://www.snapeda.com/parts/CL21B104KCFNNNE/Samsung+Electro-Mechanics/view-part/?ref=snap
  C10 C17 C18 C19 C20 C21 C22 C24 C35 C36: MP=CL21B104KCFNNNE
  C23 C25: MP=CL21A106KOQNNNE
  C26: MP=CL21A475KAQNNNE
  C27 C29: MP=CL21B103KBANNNC
  C28: MP=CL21B223KBANNNC
  C30 C31: MP=CL21B682KBANNNC
  C32 C33: MP=CL21C270JBANNNC
C11 C13: library part C0805C102F3HACAUTO, "CAP CER 0805 1NF 25V ULTRA STABL", Capacitance="1 nF", Device Package="0805 (2012 Metric)", manufacturer=KEMET, Operating Temperature="-55°C ~ 150°C", Ratings=AEC-Q200, Supplier Part Number 1=399-C0805C102F3HACAUTOCT-ND, Temperature Coefficient=X8R, Tolerance=±1%, Voltage - Rated=25V, Applications=Automotive, componentlink1description=Datasheet, componentlink1url=https://api.kemet.com/component-edge/download/datasheet/C0805C102F3HACAUTO.pdf, componentlink2description="DigiKey Link", componentlink2url=https://www.digikey.com/en/products/detail/kemet/C0805C102F3HACAUTO/7958218, Features="Low ESL, High Temperature", lastupdated="09-02-2024 8.15.10 PM", Lifecycle Status=Active, Minimum Order=1, Mounting Type="Surface Mount, MLCC", Package / Case="0805 (2012 Metric)", packaging=TapeAndReel, Part Number=C0805C102F3HACAUTO, Part Status=Active, partid=32894, price=0.04, series="SMD Auto X8R HT150C", Size / Dimension="0.079\" L x 0.049\" W (2.00mm x 1.25mm)", Supplier 1=DigiKey, Thickness (Max)="0.035\" (0.88mm)"
C12 C14 C15: library part C0805C102F3HACAUTO, "CAP CER 0805 0.1UF 100V X7R", Capacitance="100 nF", Device Package="0805 (2012 Metric)", manufacturer="Samsung Electro-Mechanics", Operating Temperature="-55°C ~ 125°C", Part Number=CL21B104KCFNNNE, Temperature Coefficient=X7R, Tolerance=±10%, Voltage - Rated=100V, Applications="General Purpose", componentlink1description=Datasheet, componentlink1url=https://pricing.snapeda.com/search?q=CL21B104KCFNNNE&ref=eda, componentlink2description="DigiKey Link", componentlink2url=https://www.digikey.com/en/products/result?keywords=CL21B104KCFNNNE, lastupdated="09-02-2024 8.15.10 PM", Lifecycle Status=Active, Minimum Order=1, Mounting Type="Surface Mount, MLCC", Package / Case="0805 (2012 Metric)", packaging=TapeAndReel, Part Status=Active, series=CL, Size / Dimension="0.079\" L x 0.049\" W (2.00mm x 1.25mm)", Supplier 1=DigiKey, Thickness (Max)=0.85mm
C16: library part ECQUAAF104M, "Film Capacitor X2 0.1uF 275VAC 15mm pitch", Package=None, Availability=Unavailable, MP=ECQUAAF104M, price=None
C34: library part C1206C102KGRACAUTO, "1000 pF Â±10% 2000V (2kV) Ceramic Capacitor X7R 1206 (3216 Metric)", Package="3216 KEMET", Check_prices=https://www.snapeda.com/parts/C1206C102KGRACAUTO/KEMET/view-part/?ref=eda, MF=KEMET, MP=C1206C102KGRACAUTO, SnapEDA_Link=https://www.snapeda.com/parts/C1206C102KGRACAUTO/KEMET/view-part/?ref=snap
D1 D2 D8: "LED Uni-Color Green 4-Pin Chip 0805 T/R", Package=None, Availability=Unavailable, MP=597-3305-607F, price=None
D3 D4 D5 D6 D9 D11 D12 D13 D15 J3: Package=None, Availability=Unavailable, price=None
  D3 D4 D6: MP=SMAJ7.5CA
  D5 D9 D11 D12 D13 D15: MP=LL4148_L1G
  J3: MP=TSS-108-01-T-D
D7: library part SMAJ7.5CA, "TVS diode unidirectional 5V standoff 400W SMA (DO-214AC); pin 1 = cathode", Package=None, Availability=Unavailable, MP=SMAJ5.0A, price=None
D10 D14 D16: "Red 640nm LED Indication - Discrete 1.85V 0805 (2012 Metric)", Package="0805 Kingbright", Check_prices=https://www.snapeda.com/parts/APT2012SRCPRV/Kingbright/view-part/?ref=eda, MF=Kingbright, MP=APT2012SRCPRV, SnapEDA_Link=https://www.snapeda.com/parts/APT2012SRCPRV/Kingbright/view-part/?ref=snap
F1 F2: "Polymeric PTC Resettable Fuse 60V 100 mA Ih Surface Mount 1812 (4532 Metric), Concave", Package="1812 Bourns", Availability="In Stock", Check_prices=https://www.snapeda.com/parts/MF-MSMF010-2/Bourns/view-part/?ref=eda, MF=Bourns, MP=MF-MSMF010-2, price=None, Purchase-URL=https://pricing.snapeda.com/search/part/MF-MSMF010-2/?ref=eda, SnapEDA_Link=https://www.snapeda.com/parts/MF-MSMF010-2/Bourns/view-part/?ref=snap
F3: library part TR5, "Fuse TR5 1A Time-Lag 250VAC (Littelfuse 372 series)", Package=None, Check_prices=https://www.snapeda.com/parts/TR5/Taiyo+Yuden/view-part/?ref=eda, MF="Taiyo Yuden", MP=TR5, SnapEDA_Link=https://www.snapeda.com/parts/TR5/Taiyo+Yuden/view-part/?ref=snap
FB1: library part MPZ2012S102AT000, Package=None, Availability=Unavailable, MP=MPZ2012S102AT000, price=None
J1: "2~24 Poles, Screw Type, Horizontal, 5.08 Pitch, 24~12 (AWG), Terminal Block Connector", Package=None, Check_prices=https://www.snapeda.com/parts/TB007-508-02BE/Same+Sky/view-part/?ref=eda, MF="Same Sky", MP=TB007-508-02BE, SnapEDA_Link=https://www.snapeda.com/parts/TB007-508-02BE/Same+Sky/view-part/?ref=snap
J2: "BergStik, Board to Board connector, Unshrouded Vertical Header, Through Hole, Single Row, 6 Positions, 2.54 mm (0.100in) Pitch.", Package=None, Check_prices=https://www.snapeda.com/parts/68604-406HLF/Amphenol/view-part/?ref=eda, MF="AMPHENOL ICC / FCI", MP=68604-406HLF, SnapEDA_Link=https://www.snapeda.com/parts/68604-406HLF/Amphenol/view-part/?ref=snap
J4: "3 Position 3.81 mm Pitch Green Right Angle Through Hole Terminal Block Header", Package=None, Availability="In Stock", Check_prices=https://www.snapeda.com/parts/284513-3/TE+Connectivity+AMP+Connectors/view-part/?ref=eda, EU_RoHS_Compliance=Compliant, MF="TE Connectivity", MP=284513-3, price=None, Purchase-URL=https://pricing.snapeda.com/search/part/284513-3/?ref=eda, SnapEDA_Link=https://www.snapeda.com/parts/284513-3/TE+Connectivity+AMP+Connectors/view-part/?ref=snap
J5: library part TBP02R138102BE, "Terminal block header 2-pos 3.81 mm, right angle (mating plug TBP01P1-381-02BE)", Package=None, Check_prices=https://www.snapeda.com/parts/TBP02R1-381-02BE/Same+Sky/view-part/?ref=eda, MF="Same Sky (CUI)", MP=TBP02R1-381-02BE, SnapEDA_Link=https://www.snapeda.com/parts/TBP02R1-381-02BE/Same+Sky/view-part/?ref=snap
J6 J7 J8 J10 J11: library part 691236510003, "3 Position Wire to Board Terminal Block Horizontal with Board 0.200 (5.08mm) Through Hole", Package=None, Check_prices=https://www.snapeda.com/parts/691236510003/W%25C3%25BCrth+Elektronik+Midcom/view-part/?ref=eda, MF="WÃ¼rth Elektronik", MP=691236510003, SnapEDA_Link=https://www.snapeda.com/parts/691236510003/W%25C3%25BCrth+Elektronik+Midcom/view-part/?ref=snap
J9: "DIP RJ45 Connector;", Package=None, Availability="Not in stock", Check_prices=https://www.snapeda.com/parts/HR911105A/HanRun/view-part/?ref=eda, MF=hanrun, MP=HR911105A, price=None, SnapEDA_Link=https://www.snapeda.com/parts/HR911105A/HanRun/view-part/?ref=snap
JP1 JP2: library part 68001-403HLF, Package=None, Availability=Unavailable, MP=68001-403HLF, price=None
K1 K2 K3: library part SRD-03VDC-SL-C, "Relays General Purpose Non Latching 3VDC SPDT 10A (250VAC) Max 5PIN", manufacturer=Songle, Package="NON STANDARD-5 Songle Relay", Check_prices=https://www.snapeda.com/parts/SRD-03VDC-SL-C/Songle+Relay/view-part/?ref=eda, MF="Songle Relay", MP=SRD-05VDC-SL-C, SnapEDA_Link=https://www.snapeda.com/parts/SRD-03VDC-SL-C/Songle+Relay/view-part/?ref=snap
PS1: "10W Ultra-Compact Power Module", Package=Package, Check_prices=https://www.snapeda.com/parts/HLK-10M05/Hi-link/view-part/?ref=eda, MF=Hi-link, MP=HLK-10M05, SnapEDA_Link=https://www.snapeda.com/parts/HLK-10M05/Hi-link/view-part/?ref=snap
PS2: library part RFM-0505S, "DC-DC Converter/Isolator, SIP4, 1kV unreg, Single Output, 1W, 5V Out, RFM Series", Package="SIP-4 Recom Power", Check_prices=https://www.snapeda.com/parts/RFM-0505S/Recom+Power/view-part/?ref=eda, MF="Recom Power", MP=RFM-0505S, SnapEDA_Link=https://www.snapeda.com/parts/RFM-0505S/Recom+Power/view-part/?ref=snap
Q1 Q2 Q4 Q5 Q6: "SOT-23, 30V, 0.1A, NPN Transistor", Package="SOT-23 Taiwan Semiconductor", Check_prices=https://www.snapeda.com/parts/BC848C%20RFG/Taiwan+Semiconductor/view-part/?ref=eda, MF="Taiwan Semiconductor", MP="BC848C RFG", SnapEDA_Link=https://www.snapeda.com/parts/BC848C%20RFG/Taiwan+Semiconductor/view-part/?ref=snap
Q3: "P-MOSFET 20V 2.3A SOT-23, reverse-polarity protection for 5V DC input", Package="SOT-23 MCC", Check_prices=https://www.snapeda.com/parts/SI2301/Micro+Commercial+Components/view-part/?ref=eda, MF=Vishay, MP=SI2301CDS-T1-GE3, SnapEDA_Link=https://www.snapeda.com/parts/SI2301/Micro+Commercial+Components/view-part/?ref=snap
R1 R2 R3 R13 R14 R15 R16 R17 R18 R19 R20 R21 R22 R23 R24 R25 R26 R27 R28 R29 R30 R31 R32 R33 R34 R35 R36 R37 R38: library part ERA6VRB1002V, Package=None, Availability=Unavailable, price=None
  R1 R2 R3 R14 R18 R19 R20 R21 R22 R32 R35: MP=ERA6VRB1002V
  R13 R15 R16 R17 R31 R33 R34 R36: MP=ERA6VRB1001V
  R23: MP=ERJ-6ENF1242V
  R24 R25 R26 R27: MP=ERJ-6ENF49R9V
  R28: MP=ERJ-6ENF10R0V
  R29 R30: MP=ERJ-6ENF3300V
  R37 R38: MP=ERA6VRB4701V
R4 R10: library part CRCW0805330RFKEAHP, "RES SMD 330 OHM 1% 1/2W 0805", Device Package="0805 (2012 Metric)", manufacturer="Vishay Dale", Operating Temperature="-55°C ~ 155°C", Power (Watts)="0.5W, 1/2W", Ratings=AEC-Q200, Supplier Device Package=0805, Supplier Part Number 1=541-330TCT-ND, Temperature Coefficient=±100ppm/°C, Tolerance=±1%, componentlink1description=Datasheet, componentlink1url=http://www.vishay.com/docs/20043/crcwhpe3.pdf, componentlink2description="DigiKey Link", componentlink2url=https://www.digikey.com/en/products/detail/vishay-dale/CRCW0805330RFKEAHP/2226912, Composition="Thick Film", Features="Automotive AEC-Q200, Pulse Withstanding", Height - Seated (Max)="0.020\" (0.50mm)", lastupdated="08-02-2024 9.02.28 PM", Lifecycle Status=Active, Minimum Order=1, Number of Terminations=2, Package / Case="0805 (2012 Metric)", packaging=TapeAndReel, Part Number=CRCW0805330RFKEAHP, Part Status=Active, partid=30364, price=0.02, Resistance="330 Ohms", series=CRCW-HP, Size / Dimension="0.079\" L x 0.049\" W (2.00mm x 1.25mm)", Supplier 1=DigiKey
R5 R9: library part CPF0805B1K0E, "RES SMD 330 OHM 1% 1/8W 0805", Device Package="0805 (2012 Metric)", manufacturer="TE Connectivity Passive Product", Operating Temperature="-55°C ~ 155°C", Part Number=CPF0805B470RE, Power (Watts)="0.1W, 1/10W", Resistance="470 Ohms", Supplier Device Package=0805, Temperature Coefficient=±25ppm/°C, Tolerance=±0.1%, componentlink1description=Datasheet, componentlink1url=https://www.te.com/commerce/DocumentDelivery/DDEController?Action=srchrtrv&DocNm=1773200&DocType=DS&DocLang=English, componentlink2description="DigiKey Link", Composition="Thin Film", Height - Seated (Max)="0.026\" (0.65mm)", lastupdated="08-02-2024 9.02.39 PM", Lifecycle Status=Active, Minimum Order=1, Number of Terminations=2, Package / Case="0805 (2012 Metric)", packaging=TapeAndReel, Part Status=Active, partid=27725, price=0.09, series="CPF, Neohm", Size / Dimension="0.079\" L x 0.049\" W (2.00mm x 1.25mm)", Supplier 1=DigiKey
R6 R11: library part CPF0805B10KE, "RES SMD 10K OHM 0.1% 1/10W 0805", Device Package="0805 (2012 Metric)", manufacturer="TE Connectivity Passive Product", Operating Temperature="-55°C ~ 155°C", Power (Watts)="0.1W, 1/10W", Supplier Device Package=0805, Supplier Part Number 1=A106043CT-ND, Temperature Coefficient=±25ppm/°C, Tolerance=±0.1%, componentlink1description=Datasheet, componentlink1url=https://www.te.com/commerce/DocumentDelivery/DDEController?Action=srchrtrv&DocNm=1773200&DocType=DS&DocLang=English, componentlink2description="DigiKey Link", componentlink2url=https://www.digikey.com/en/products/detail/te-connectivity-passive-product/CPF0805B10KE/2389790, Composition="Thin Film", Height - Seated (Max)="0.026\" (0.65mm)", lastupdated="08-02-2024 9.02.39 PM", Lifecycle Status=Active, Minimum Order=1, Number of Terminations=2, Package / Case="0805 (2012 Metric)", packaging=TapeAndReel, Part Number=CPF0805B10KE, Part Status=Active, partid=27724, price=0.09, Resistance="10 kOhms", series="CPF, Neohm", Size / Dimension="0.079\" L x 0.049\" W (2.00mm x 1.25mm)", Supplier 1=DigiKey
R7: library part CPF0805B10KE, "RES SMD 120 OHM 1% 1/8W 0805", Device Package="0805 (2012 Metric)", manufacturer="TE Connectivity Passive Product", Operating Temperature="-55°C ~ 155°C", Power (Watts)="0.1W, 1/10W", Resistance="10 kOhms", Supplier Device Package=0805, Supplier Part Number 1=A106043CT-ND, Temperature Coefficient=±25ppm/°C, Tolerance=±0.1%, componentlink1description=Datasheet, componentlink1url=https://www.te.com/commerce/DocumentDelivery/DDEController?Action=srchrtrv&DocNm=1773200&DocType=DS&DocLang=English, componentlink2description="DigiKey Link", componentlink2url=https://www.digikey.com/en/products/detail/te-connectivity-passive-product/CPF0805B10KE/2389790, Composition="Thin Film", Height - Seated (Max)="0.026\" (0.65mm)", lastupdated="08-02-2024 9.02.39 PM", Lifecycle Status=Active, Minimum Order=1, Number of Terminations=2, Package / Case="0805 (2012 Metric)", packaging=TapeAndReel, Part Number=CPF0805B10KE, Part Status=Active, partid=27724, price=0.09, series="CPF, Neohm", Size / Dimension="0.079\" L x 0.049\" W (2.00mm x 1.25mm)", Supplier 1=DigiKey
R8: library part CPF0805B1K0E, "RES SMD 1K OHM 0.1% 1/10W 0805", Device Package="0805 (2012 Metric)", manufacturer="TE Connectivity Passive Product", Operating Temperature="-55°C ~ 155°C", Power (Watts)="0.1W, 1/10W", Supplier Device Package=0805, Supplier Part Number 1=A106044CT-ND, Temperature Coefficient=±25ppm/°C, Tolerance=±0.1%, componentlink1description=Datasheet, componentlink1url=https://www.te.com/commerce/DocumentDelivery/DDEController?Action=srchrtrv&DocNm=1773200&DocType=DS&DocLang=English, componentlink2description="DigiKey Link", componentlink2url=https://www.digikey.com/en/products/detail/te-connectivity-passive-product/CPF0805B1K0E/2390399, Composition="Thin Film", Height - Seated (Max)="0.026\" (0.65mm)", lastupdated="08-02-2024 9.02.39 PM", Lifecycle Status=Active, Minimum Order=1, Number of Terminations=2, Package / Case="0805 (2012 Metric)", packaging=TapeAndReel, Part Number=CPF0805B1K0E, Part Status=Active, partid=27725, price=0.09, Resistance="1 kOhms", series="CPF, Neohm", Size / Dimension="0.079\" L x 0.049\" W (2.00mm x 1.25mm)", Supplier 1=DigiKey
R12: library part CRCW0805330RFKEAHP, "RES SMD 150 OHM 1% 1/2W 0805", Device Package="0805 (2012 Metric)", manufacturer="Vishay Dale", Operating Temperature="-55°C ~ 155°C", Part Number=CRCW0805150RFKEAHP, Power (Watts)="0.5W, 1/2W", Ratings=AEC-Q200, Supplier Device Package=0805, Supplier Part Number 1=541-150TCT-ND, Temperature Coefficient=±100ppm/°C, Tolerance=±1%, componentlink1description=Datasheet, componentlink1url=http://www.vishay.com/docs/20043/crcwhpe3.pdf, componentlink2description="DigiKey Link", componentlink2url=https://www.digikey.com/en/products/detail/vishay-dale/CRCW0805150RFKEAHP/2222332, Composition="Thick Film", Features="Automotive AEC-Q200, Pulse Withstanding", Height - Seated (Max)="0.020\" (0.50mm)", lastupdated="08-02-2024 9.02.28 PM", Lifecycle Status=Active, Minimum Order=1, Number of Terminations=2, Package / Case="0805 (2012 Metric)", packaging=TapeAndReel, Part Status=Active, partid=30364, price=0.02, Resistance="150 Ohms", series=CRCW-HP, Size / Dimension="0.079\" L x 0.049\" W (2.00mm x 1.25mm)", Supplier 1=DigiKey
R39 R40 R41 R42: library part CPF0805B1K0E, "RES SMD 47 OHM 1% 1/8W 0805", Device Package="0805 (2012 Metric)", manufacturer=YAGEO, Operating Temperature="-55°C ~ 155°C", Part Number=RC0805FR-0747RL, Power (Watts)="0.1W, 1/10W", Supplier Device Package=0805, Temperature Coefficient=100ppm/C, Tolerance=1%, Composition="Thick Film", Height - Seated (Max)="0.026\" (0.65mm)", Lifecycle Status=Active, Minimum Order=1, Number of Terminations=2, Package / Case="0805 (2012 Metric)", packaging=TapeAndReel, Part Status=Active, Resistance="47 Ohms", series=RC, Size / Dimension="0.079\" L x 0.049\" W (2.00mm x 1.25mm)"
RT1: library part B57236S0509M000, "NTC Inrush Current Limiter 5 Ohm 20% 4.5A 11.5mm", Package=None, Check_prices=https://www.snapeda.com/parts/B57236S0509M000/TDK/view-part/?ref=eda, MF="EPCOS - TDK Electronics", MP=B57236S0509M000, SnapEDA_Link=https://www.snapeda.com/parts/B57236S0509M000/TDK/view-part/?ref=snap
RV1: library part MOV-14D471K, "Varistor 14mm 470V (300VAC)", Package=None, Check_prices=https://www.snapeda.com/parts/MOV-14D471K/HuaXingAn+Electronics/view-part/?ref=eda, MF="HuaXingAn Electronics", MP=MOV-14D471K, SnapEDA_Link=https://www.snapeda.com/parts/MOV-14D471K/HuaXingAn+Electronics/view-part/?ref=snap
U1: "Bluetooth, WiFi 802.11b/g/n, Bluetooth v4.2 +EDR, Class 1, 2 and 3 Transceiver Module 2.4GHz ~ 2.5GHz Antenna Not Included, U.FL Surface Mount", Package="Module Espressif Systems", Availability="In Stock", Check_prices=https://www.snapeda.com/parts/ESP32-WROOM-32/Espressif+Systems/view-part/?ref=eda, MF="Espressif Systems", MP=ESP32-WROOM-32, price=None, Purchase-URL=https://pricing.snapeda.com/search/part/ESP32-WROOM-32/?ref=eda, SnapEDA_Link=https://www.snapeda.com/parts/ESP32-WROOM-32/Espressif+Systems/view-part/?ref=snap
U2: "Inverter IC 6 Channel Schmitt Trigger 14-SOIC", Package="SO14-14 Nexperia USA Inc.", Check_prices=https://www.snapeda.com/parts/74HC14D/Toshiba/view-part/?ref=eda, MF=Toshiba, MP=74HC14D, SnapEDA_Link=https://www.snapeda.com/parts/74HC14D/Toshiba/view-part/?ref=snap
U3: "Differential Bus Transceiver", Package="SOIC-8 Texas Instruments", Check_prices=https://www.snapeda.com/parts/SN65176BDR/Texas+Instruments/view-part/?ref=eda, MF="Texas Instruments", MP=SN65176BDR, SnapEDA_Link=https://www.snapeda.com/parts/SN65176BDR/Texas+Instruments/view-part/?ref=snap
U4: "General Purpose Digital Isolator 2500Vrms 2 Channel 25Mbps 8-SOIC", Package="SOIC-8 Analog Devices", Check_prices=https://www.snapeda.com/parts/ADUM1201CR/Analog+Devices/view-part/?ref=eda, MF="Analog Devices", MP=ADUM1201CR, SnapEDA_Link=https://www.snapeda.com/parts/ADUM1201CR/Analog+Devices/view-part/?ref=snap
U5 U6: library part EL817S1(A)(TU)-V, "Optoisoltr 5kv Transistor 4-Smd", Package=None, Availability=Unavailable, MF="{'manufacturer': u'Everlight Electronics Co Ltd'}", MP=EL817S1(A)(TU)-V, price=None
U7: "Hardwired TCP/IP embedded Ethernet controller", Package=None, Availability=Unavailable, MP=W5500, price=None
U8: "EEPROM Memory IC 512Kb (64K x 8) IÂ²C 400 kHz 900 ns 8-SOIC", Package="SO-8 Microchip", Check_prices=https://www.snapeda.com/parts/AT24C512C-SSHM-T/Microchip/view-part/?ref=eda, MF=Microchip, MP=AT24C512C-SSHM-T, SnapEDA_Link=https://www.snapeda.com/parts/AT24C512C-SSHM-T/Microchip/view-part/?ref=snap
VR1: "LM1117IMPX-3.3V 800-mA 15-V linear voltage regulator SOT-223", Package="SOT-223-4 Texas Instruments", Check_prices=https://www.snapeda.com/parts/LM1117IMPX-3.3/NOPB/Texas+Instruments/view-part/?ref=eda, MF="Texas Instruments", MP=LM1117IMPX-3.3/NOPB, SnapEDA_Link=https://www.snapeda.com/parts/LM1117IMPX-3.3/NOPB/Texas+Instruments/view-part/?ref=snap
Y1: library part FOXSDLF/128-20, "12.288 MHz Â±30ppm Crystal 20pF 60 Ohms HC-49/US", Package="HC49SD Fox Electronics", Check_prices=https://www.snapeda.com/parts/FOXSDLF/128-20/Fox+Electronics/view-part/?ref=eda, MF="Fox Electronics", MP=ECS-250-18-5PX-TR, SnapEDA_Link=https://www.snapeda.com/parts/FOXSDLF/128-20/Fox+Electronics/view-part/?ref=snap

## Free pads (board coordinates)
  round 236 hole 126: MH1(3610,1084) MH2(3610,5894) MH3(150,5894) MH4(150,1084)

## Via types
v1: diameter 26, hole 12, Top Layer to Bottom Layer, tented both sides, 166 vias
v2: diameter 50, hole 28, Top Layer to Bottom Layer, tented both sides, 49 vias

## Nets (pads, with @x,y where several pads share a name; then routed paths per layer and width w, separated by ;. In a path a pad name is that pad's centre, name@x,y a point inside that pad or via, vN(x,y) a via of type N, cw(c..) or ccw(c..) an arc to the next point about the centre after c; other vN are vias at no path point)
3V3: C4.2 C6.1 C7.1 C8.1 C14.2 C24.1 C25.1 C36.1 FB1.1 J2.4 J9.9 J9.12 R1.1 R12.1 R18.2 R19.2 R20.2 R21.2 R22.2 R37.2 R38.2 U1.2 U4.1 U7.28 U8.8 VR1.2 VR1.4 | length 14293.2
  Top Layer w8: R20.2@1270,1869 R21.2@1330,1869 ; v1(1350,1834) R21.2@1350,1859 ; v1(1410,1834) R22.2@1410,1859 ; R22.2@1430,1869 v1(1567.5,1869) ; FB1.1@1505,649 v1(1505,676.5) ; U7.28@1614.57,1044.79 1650.28,1044.79 ; v1(1632.5,1869) v1@1637.5,1869 ; v1(1725,751.5) 1725,769 C25.1@1745,789 ; 1730,1626.5 1737.5,1619 v1(1737.5,1229) ; C24.1@1750,1036.5 v1(1777.5,1036.5) ; C24.1@1760,1036.5 1805,991.5 1805,839 C25.1@1775,809
  Top Layer w10: C36.1@295,1574 R38.2@295,1621.5 ; R38.2@302.5,1621.5 327.5,1596.5 405,1596.5 R37.2@440,1631.5 ; J9.9@402.5,231.5 445,189 850,189 J9.12@897.5,236.5 ; v1(415,1661.5) 427.5,1649 R37.2@440,1649 ; U8.8@540,1736.5 v1(560,1736.5) ; J9.12@925,241.5 1192.5,509 v1(1380,509) ; v1(1470,599) 1490,619 FB1.1@1495,619 ; 1650.3,1044.79 C24.1@1735,1044.79
  Top Layer w12: v2(545,2179) 595,2129 635,2129 665,2159 665,2299 U1.2@662.91,2299.35 ; R1.1@653.74,2114 655,2114 695,2074 780,2074 820,2114 C7.1@821.93,2114
  Top Layer w15: R12.1@1904.45,3184 1945.98,3184 1980,3218.02
  Top Layer w20: R1.1@635,2129 650,2114 655,2114 R1.1@653.74,2114 ; J2.4@800,3394 800,3499 845,3544 U4.1@845,3541.56 ; C7.1@821.93,2114 820,2114 820,2154 865,2199 975,2199 1060,2114 C8.1@1061.93,2114 ; C8.1@1040,2134 1105,2199 1195,2199 1250,2144 1920,2144 1980,2204 1980,3234 2030,3284 2180,3284 2250,3354 2810,3354 2860,3404 3060,3604 3585,3604 3635,3654 3635,3859 3635,5539 3545,5629 3120,5629 C4.2@3120,5629.87 ; v2(1070,3404) 1075,3404 1160,3489 1160,3514 C14.2@1161.5,3514 ; 1600,2139 1645,2094 1645,1764 R19.2@1610,1729 ; R19.2@1610,1709 1610,1699 1675,1634 1725,1634 1770,1679 R18.2@1770,1709 ; R12.1@1915,3184 1930,3184 ; C6.1@3260,5629 3260,5639 C6.1@3260,5639.63 ; VR1.2@3500.55,5494 3500,5494 3561.72,5555.72 3618.28,5555.72 ; VR1.4@3500.55,5736.91 3500,5739 3500,5669 3540,5629
  Bottom Layer w8: v1(1350,1834) v1(1410,1834) ; v1(1505,676.5) 1532.5,649 1622.5,649 v1(1725,751.5) ; v1(1567.5,1869) v1(1632.5,1869) ; v1(1737.5,1229) 1777.5,1189 v1(1777.5,1036.5)
  Bottom Layer w10: v1(415,1661.5) 450,1696.5 450,1736.5 ; v2@535,2156.5 320,1941.5 320,1754 337.5,1736.5 v1(560,1736.5) ; v1(1380,509) v1(1470,599)
  Bottom Layer w12: v2(545,2179) 590,2224 590,3184 J2.4@800,3394
  Bottom Layer w20: J2.4@800,3394 855,3449 1025,3449 v2(1070,3404)
  other v1: 2800,5724 2920,5724 3040,5724 3160,5724 3280,5724 3370,5724 2800,5844 2920,5844 3040,5844 3160,5844 3280,5844 3370,5844 2800,5964 2920,5964 3040,5964 3160,5964 3280,5964 3370,5964
3V3A: C19.1 C20.1 C21.1 C22.1 C23.1 FB1.2 R24.2 R25.2 R28.2 U7.4 U7.8 U7.11 U7.15 U7.17 U7.21 | length 2894.5
  Top Layer w7: 1240,1006.5 1250,1006.5
  Top Layer w7.5: 1380,886.5 1380,894
  Top Layer w8: R24.2@485,1486.5 485,1599 R25.2@515,1629 ; R25.2@535,1639 R28.2@615,1639 ; R28.2@635,1649 675,1689 875,1689 1237.5,1326.5 v1(1237.5,1256.5) ; v1(1227.5,994) 1240,1006.5 ; v1(1232.5,1064) 1250,1064 ; 1245,1006.5 1237.5,999 1237.5,971.5 1327.5,881.5 1375,881.5 1380,886.5 ; 1249.72,1005.42 U7.11@1285.43,1005.42 ; 1249.72,1064.47 U7.8@1285.43,1064.47 1336,1064.47 1336,1143.21 U7.4@1285.43,1143.21 ; C19.1@1255,789 1225,759 1225,696.5 1272.5,649 C23.1@1335,649 ; C19.1@1285,799 C20.1@1325,799 ; C20.1@1340,809 1340,881.5 ; 1380,889 1387.5,881.5 1415,881.5 1420,886.5 ; 1381.1,893.72 U7.15@1381.1,929.43 ; 1420,894 1420,886.5 ; 1420.47,893.72 U7.17@1420.47,929.43 ; v1(1432.5,871.5) 1420,884 1420,886.5 ; C21.1@1490,809 v1(1490,844) 1500,854 1500,894 ; 1499.21,893.72 U7.21@1499.21,929.43 ; v1(1547.5,679) 1547.5,664 FB1.2@1562.5,649 ; v1(1550,849) 1577.5,849 1605,821.5 C22.1@1605,809
  Bottom Layer w8: v1(1227.5,994) 1227.5,1059 v1(1232.5,1064) 1237.5,1069 v1(1237.5,1256.5) ; v1(1432.5,871.5) 1460,844 v1(1490,844) 1545,844 v1(1550,849) ; v1(1547.5,679) v1@1547.5,846.5
+5: C3.P C5.2 D7.C D9.C D13.C D15.C K1.COIL1 K2.COIL1 K3.COIL1 PS1.4 PS2.2 Q3.2 VR1.3 | length 9678.4
  Top Layer w12: K3.COIL1@2634,1930.2 2634,1984 ; K2.COIL1@2634,2580.2 2634,2634
  Top Layer w20: v1(2060,2396.5) v1(2060,2891.5) ; v1(2072.5,1941.5) 2075,1939 D13.C@2262.5,1939 ; v1(2072.5,2324) 2385,2636.5 2630,2636.5 ; v1(2072.5,3056.5) 2035,3094 2035,3199 2087.5,3251.5 2230,3251.5 v2@2250,3271.5 ; 2285,2536.5 D9.C@2285,2571.5 ; D13.C@2307.5,1939 2355,1986.5 2630,1986.5 ; D15.C@2372.5,1356.5 2372.5,1461.5 2262.5,1571.5 2262.5,1866.5 2382.5,1986.5 ; D7.C@3083.27,5007 v2(3150,5006.6) Q3.2@3206.69,5006.6 ; v2(3180,5284) C5.2@3470,5284 ; VR1.3@3591.1,5494 3590,5494 3470,5374 C5.2@3470,5284 ; C5.2@3470,5284 C5.2@3470,5284.43 C5.2@3470,5284
  Bottom Layer w10: K1.COIL1@2637,3268 2653,3287
  Bottom Layer w20: v1(2060,2396.5) 2060,2336.5 v1(2072.5,2324) v1(2072.5,1941.5) ; v1(2060,2891.5) 2072.5,2904 v1(2072.5,3056.5) ; PS1.4@2218.23,4947.66 2220,4949 2510,4949 ; PS2.2@2748.43,4505.1 2750,4504 2750,4709 2510,4949 ; v2(3150,5006.6) 3150,5094 3070,5174 ; v2(3180,5284) 3070,5174 ; 2510,4949 C3.P@2785,5224 2835,5174 3070,5174
  Bottom Layer w25: v2(2260,3294) 2260,3309 2300,3349 2810,3349 2860,3399 3057,3596 3655,3596 3705,3646 3705,5109 v2(3470,5344) ; 2653,3287 2700,3349
A: J3.09 U1.31 | length 1202.4
  Top Layer w10: U1.31@962.91,2968.65 965,2969 965,3029 v2(975,3039)
  Bottom Layer w10: v2(975,3039) 1465,2549 1720,2549 1755,2584 1755,2649 J3.09@1800,2694
AC_L_F: F3.2 RT1.1 RV1.1 | length 677.1
  Top Layer w40: F3.2@1060,4374 1100,4414 1100,4664 RV1.1@1097.64,4664 ; 1100,4524 1140,4484 1450,4484 RT1.1@1451.57,4484
AC_L_PS: C16.1 PS1.2 RT1.2 | length 1877.5
  Top Layer w40: PS1.2@545,5239 1065,5239 1706.72,4597.28 1763.28,4597.28 ; RT1.2@1648.43,4484 1650,4484 1870,4704 1950,4704 C16.1@1949.28,4704
AC_N: C16.2 J1.2 PS1.1 RV1.2 | length 2374.3
  Top Layer w40: J1.2@240,4374 526.5,4374 540,4387.5 540,4404 RV1.2@800,4664 ; C16.2@1358.72,4704 1360,4704 1225,4839 975,4839 RV1.2@800,4664 ; RV1.2@800,4664 RV1.2@802.36,4664 RV1.2@800,4664
  Bottom Layer w40: PS1.1@545,5546.09 545,5544 800,5289 800,4664 RV1.2@802.36,4664
B: J3.10 U1.37 | length 1186.3
  Top Layer w10: U1.37@662.91,2968.65 662.9,2933.07 691.97,2904 1360,2904 1395,2869 1395,2844 1400,2844 1550,2694 J3.10@1700,2694
C: J3.11 U1.30 | length 1051.5
  Top Layer w10: U1.30@1012.91,2968.65 1015,2969 1025,2979 v2(1025,3084)
  Bottom Layer w10: v2(1025,3084) 1025,3024 1210,2839 1755,2839 J3.11@1800,2794
CLK: J3.13 U1.13 | length 1018
  Top Layer w10: U1.13@1212.91,2299.35 1215,2299 1215,2264 1240,2239 1305,2239 1385,2319 1390,2319 1620,2549 1620,2579 1690,2649 1720,2649 1755,2684 1755,2849 J3.13@1800,2894
DE/RE: U2.10 U3.2 U3.3 | length 406.7
  Top Layer w10: U2.10@1652,3789 1650,3789 1665,3774 1985,3774 ; U3.3@2000.51,3739 2000,3739 1985,3754 1985,3774 ; U3.2@2000.51,3789 2000,3789 1985,3774
DI: D5.C R8.2 U2.8 U3.4 | length 473.9